# Altium PCB TYPEC_4KTransmitter-v1.0.PcbDoc (part 7 of 12)
Units mil, origin at the board's own origin, x right, y up, seen from the top; angles counter-clockwise.
Board outline 2834.7 x 1259.84 mil, 10 copper layers (Top Layer, GND-1, Signal L1, GND-2, PWR-1, PWR-2, GND-3, Signal L2, GND-4, Bottom Layer), stack 61.686 mil thick; 475 components, 338 nets, 2161 pads, 1240 vias.
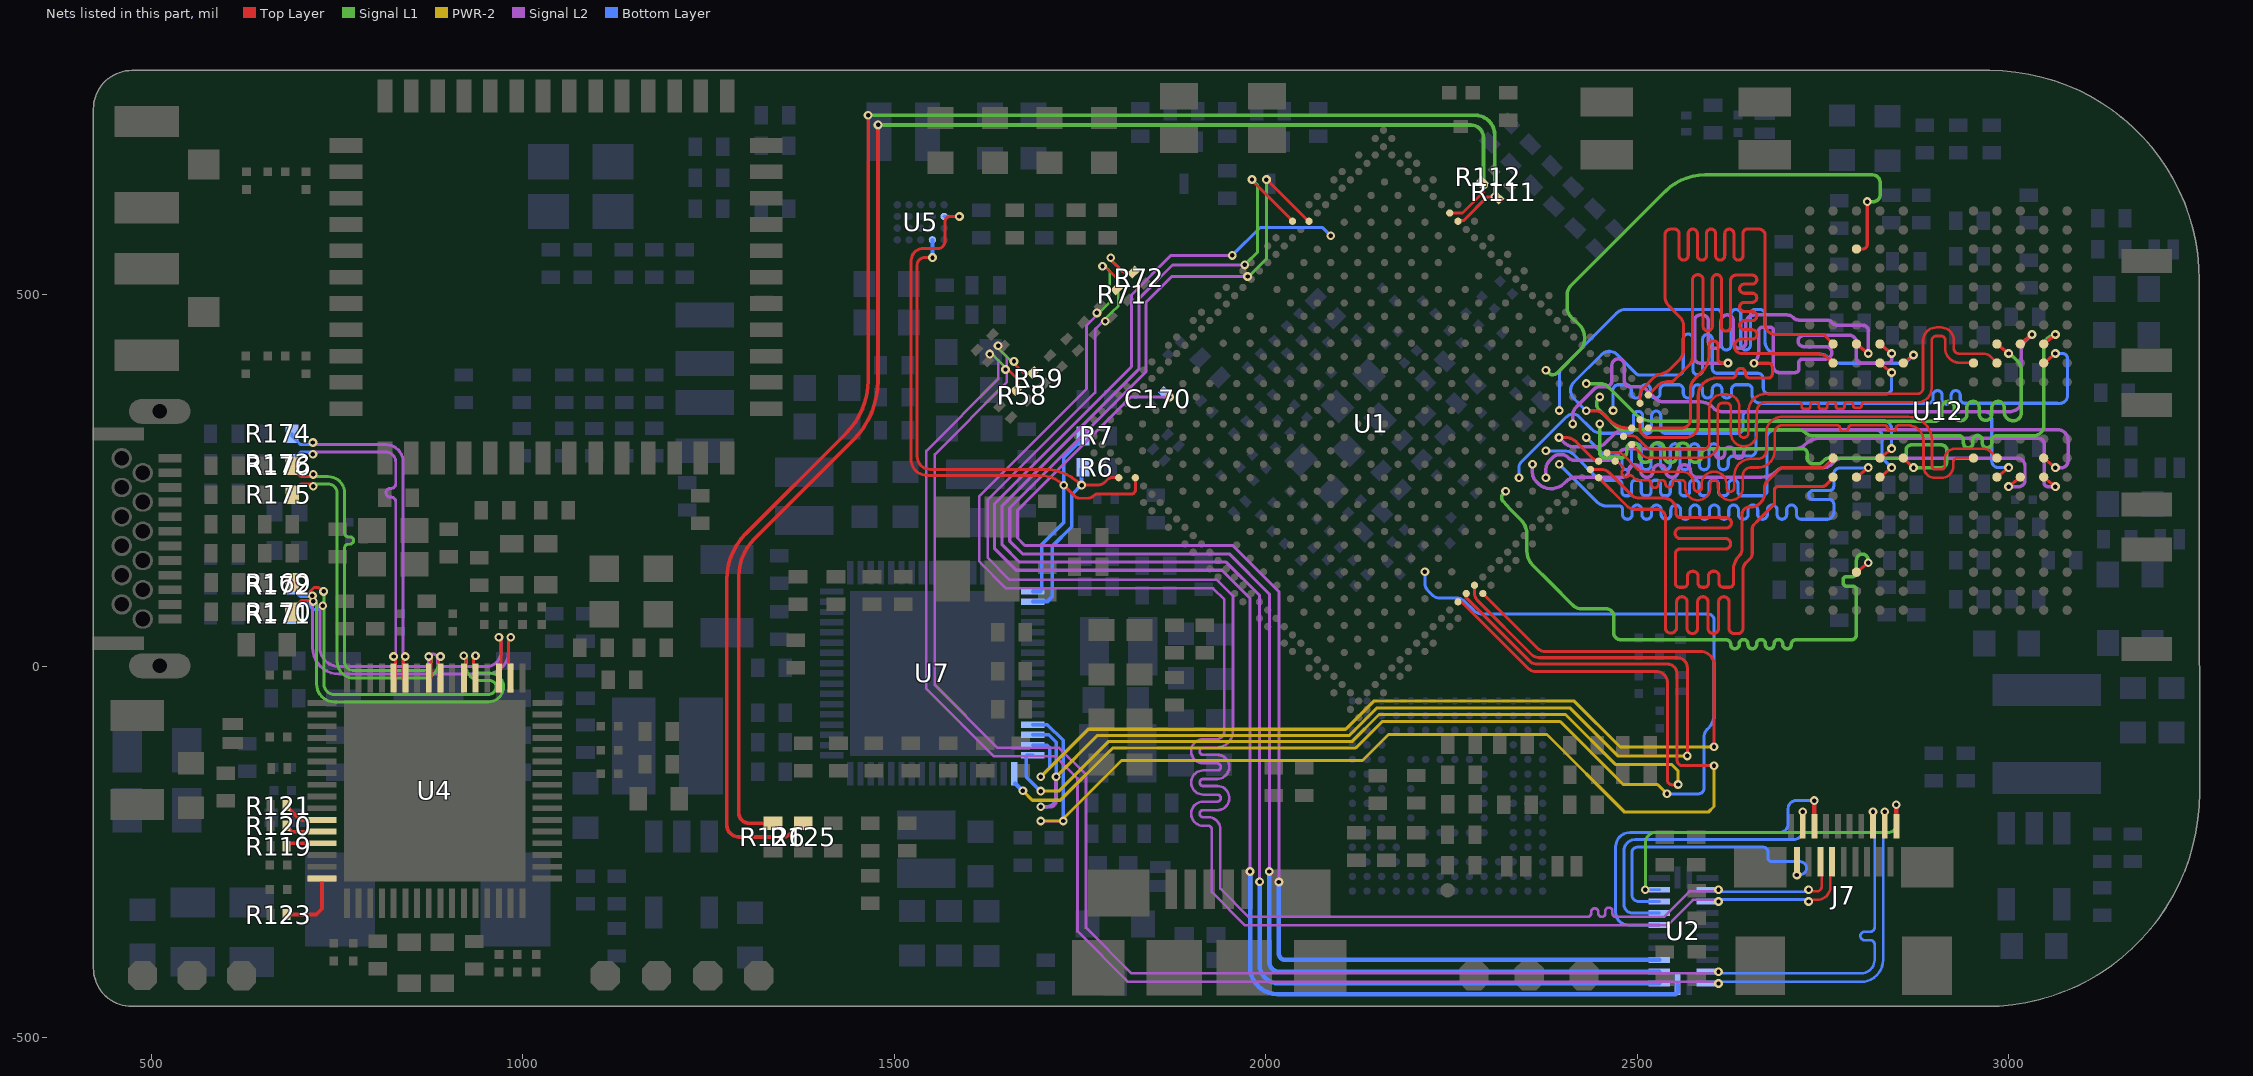
[diagram p13: the nets of this part, all layers, seen from the top]

## Via types
v1: diameter 11.81, hole 5.91, Top Layer to Bottom Layer, tented both sides, 710 vias
v2: diameter 15.75, hole 7.87, Top Layer to Bottom Layer, tented both sides, 265 vias
v3: diameter 11.81, hole 5.91, Top Layer to Signal L1, tented both sides, 146 vias
v4: diameter 11.81, hole 5.91, Signal L2 to Bottom Layer, 60 vias
v5: diameter 11.81, hole 5.91, Signal L1 to Signal L2, 38 vias
v6: diameter 11.81, hole 5.91, Top Layer to Signal L1, 16 vias
v7: diameter 11.81, hole 5.91, Top Layer to Bottom Layer, 4 vias
v8: diameter 11.81, hole 5.91, Signal L1 to Signal L2, tented both sides, 1 vias

## Nets (pads, with @x,y where several pads share a name; then routed paths per layer and width w, separated by ;. In a path a pad name is that pad's centre, name@x,y a point inside that pad or via, vN(x,y) a via of type N, cw(c..) or ccw(c..) an arc to the next point about the centre after c; other vN are vias at no path point) (continued)
HDMI_TX2_N: J7.5 R59.2 U2.21 | length 2361.6
  Top Layer w3.5: v3(1661.42,409.97) 1659.86,408.48 1659.91,408.43 1667.82,400.71 1672.17,396.36 ccw(c1678.29,402.49) 1672.64,395.93 ccw(c1678.29,402.49) 1678.29,393.83 1680.73,393.83 1680.76,393.79 1685.81,393.79 R59.2@1687.2,395.18
  Signal L1 w3.5: v5@1638.43,429.45 1659.63,408.72 cw(c1651.56,400.53) 1659.86,408.48 v3(1661.42,409.97) ; v5@1638.41,429.46 v5(1639.94,430.99)
  Signal L2 w3.5: v5(1639.94,430.99) 1638.41,429.46 1651.6,416.28 1651.6,381.68 1554.84,284.92 1554.84,-25.85 1639.05,-110.07 1722.04,-110.07 1758.33,-146.35 1758.33,-352.16 1819.84,-413.67 2609.6,-413.67 v4(2609.6,-411.52)
  Bottom Layer w3.5: v4(2609.6,-411.52) ccw(c2611.76,-411.52) 2611.76,-413.67 2801.41,-413.67 ccw(c2801.41,-395.44) 2819.64,-395.44 2819.64,-376.57 2819.64,-374.82 ccw(c2813.89,-374.82) 2813.89,-369.07 2806.28,-369.07 cw(c2806.28,-363.32) 2806.28,-357.57 2813.89,-357.57 ccw(c2813.89,-351.82) 2819.64,-351.82 2819.64,-334.6 2819.64,-198.43 ccw(c2817.49,-198.43) v1(2817.49,-196.27)
HDMI_TX2_P: J7.3 R58.2 U2.22 | length 2361.6
  Top Layer w3.5: v3(1650,399.03) 1651.56,400.53 ccw(c1659.86,408.48) 1651.83,400.25 1655.9,396.28 1659.73,392.54 1664.29,387.98 cw(c1661.82,385.5) 1664.53,387.72 cw(c1658.62,382.89) 1666.25,382.89 1666.25,379 1664.7,377.45 R58.2@1664.7,372.41
  Signal L1 w3.5: v5(1628.76,419.81) 1630.28,421.33 ccw(c1634.35,425.4) 1630.33,421.28 1651.51,400.57 1651.56,400.52 v3(1650,399.03)
  Signal L2 w3.5: v5(1628.76,419.81) 1630.28,421.33 1640.1,411.52 1640.1,386.44 1543.34,289.68 1543.34,-30.62 1634.29,-121.57 1717.28,-121.57 1746.83,-151.12 1746.83,-356.92 1815.08,-425.17 2609.6,-425.17 v4(2609.6,-427.33)
  Bottom Layer w3.5: v4(2609.6,-427.33) cw(c2611.76,-427.33) 2611.76,-425.17 2801.41,-425.17 ccw(c2801.41,-395.44) 2831.14,-395.44 2831.14,-198.43 cw(c2833.3,-198.43) v1(2833.3,-196.27)
HDMI_TX_CEC: J7.15 U2.6 | length 503.6
  Top Layer w6: J7.15@2738.58,-215.28 v1(2738.58,-181.19) v1@2738.58,-179.97
  Bottom Layer w4: U2.6@2529.88,-348.4 2487.87,-348.4 cw(c2487.87,-331.76) 2471.23,-331.76 2471.23,-243.21 cw(c2490.25,-243.21) 2490.25,-224.19 2691.44,-224.19 ccw(c2691.44,-212.28) 2703.35,-212.28 2703.35,-191.7 cw(c2713.86,-191.7) 2713.86,-181.19 v1(2738.58,-181.19)
HDMI_TX_HPD: J7.1 U2.9 | length 489.2
  Top Layer w4: v1(2848.79,-186.84) v1@2848.9,-186.95 ; J7.1@2848.9,-215.37 J7.1@2849.02,-215.48
  Top Layer w6: J7.1@2848.9,-215.37 v1@2848.9,-186.95
  Signal L1 w4: v1(2511.11,-301.15) 2511.11,-238.17 cw(c2525.1,-238.17) 2525.1,-224.19 2838.07,-224.19 ccw(c2838.07,-213.3) 2848.96,-213.3 2848.96,-186.84 v1(2848.79,-186.84)
  Bottom Layer w4: v1(2511.11,-301.15) U2.9@2529.88,-301.15
HDMI_TX_SCL: J7.17 U2.7 | length 421.6
  Top Layer w4: J7.17@2723.04,-215.48 v1@2723.04,-198.95
  Bottom Layer w4: U2.7@2529.88,-332.65 2494.06,-332.65 cw(c2494.06,-321.02) 2482.42,-321.02 2482.42,-249.37 2482.41,-249.02 cw(c2497.35,-248.62) 2497.35,-233.68 2710.69,-233.68 ccw(c2710.69,-221.33) 2723.04,-221.33 v1@2723.04,-198.95
  other v1: 2723.04,-196.27
HDMI_TX_SDA: J7.18 U2.8 | length 393.3
  Top Layer w4: v1(2715.08,-281.28) 2715.16,-281.2 J7.18@2715.16,-263.51
  Bottom Layer w4: U2.8@2529.88,-316.9 2502.03,-316.9 cw(c2502.03,-307.93) 2493.06,-307.93 2493.06,-250.93 cw(c2500.12,-250.93) 2500.12,-243.87 2670.09,-243.87 cw(c2670.09,-249.78) 2676,-249.78 2676,-257.6 ccw(c2681.79,-257.6) 2681.79,-263.39 2719.91,-263.39 cw(c2719.91,-267.39) 2720.25,-263.4 cw(c2719.4,-272.08) 2721.35,-280.57 v1(2715.08,-281.28)
HDMI_TXCLK_N: J7.14 R72.2 U2.14 | length 2361.8
  Top Layer w3.5: v3(1791.69,549.37) 1790.17,547.84 1801.95,536.06 1806.48,531.53 ccw(c1813.29,538.35) 1813.29,528.72 1815.69,528.72 1817.16,530.18 R72.2@1822.2,530.18 ; v1(2730.91,-301.09) 2730.91,-303.25 2741.99,-303.25 ccw(c2741.99,-296.71) 2748.53,-296.71 2748.53,-265.39 J7.14@2746.66,-263.51
  Signal L1 w3.5: v5(1784.14,464.1) 1782.61,465.62 1792.57,475.58 1801.72,484.73 1801.72,536.29 1793.85,544.16 cw(c1799.05,549.37) 1792.25,546.56 cw(c1799.05,549.37) v3(1791.69,549.37)
  Signal L2 w3.5: 1770.51,453.52 1770.51,368.02 1625.85,223.36 1625.85,145.75 1655.53,116.07 1934.3,116.07 1956.07,94.3 1956.07,-87.33 cw(c1933.37,-87.33) 1933.37,-110.02 1916.01,-110.02 ccw(c1916.01,-114.77) 1916.01,-119.52 1934.96,-119.52 cw(c1934.96,-135.77) 1934.96,-152.02 1916.01,-152.02 ccw(c1916.01,-156.77) 1916.01,-161.52 1934.96,-161.52 cw(c1934.96,-177.77) 1942.95,-191.93 cw(c1934.96,-177.77) 1934.96,-194.02 1916.01,-194.02 ccw(c1916.01,-198.77) 1916.01,-203.52 1922.99,-203.52 cw(c1922.99,-219.62) 1939.08,-219.62 1939.08,-299.52 1977.23,-337.67 2433.53,-337.67 ccw(c2433.53,-332.92) 2438.28,-332.92 2438.28,-331.04 cw(c2443.03,-331.04) 2447.78,-331.04 2447.78,-332.92 ccw(c2452.53,-332.92) 2457.28,-332.92 2457.28,-329.91 cw(c2462.03,-329.91) 2466.78,-329.91 2466.78,-332.92 ccw(c2471.53,-332.92) 2471.53,-337.67 2536.03,-337.67 2570.46,-303.25 2609.6,-303.25 v4(2609.6,-301.09) ; 1770.89,453.9 1778.93,461.94 cw(c1784.14,456.74) v5(1784.14,464.1)
  Bottom Layer w3.5: v4(2609.6,-301.09) ccw(c2612.21,-301.09) 2612.21,-303.7 2728.3,-303.7 ccw(c2728.3,-301.09) v1(2730.91,-301.09)
HDMI_TXCLK_P: J7.12 R71.2 U2.15 | length 2361.8
  Top Layer w3.5: v3(1780.51,538.19) 1782.04,539.71 1793.82,527.93 1798.99,522.76 cw(c1793.62,517.39) 1801.21,517.39 1801.21,514.24 1799.7,512.72 R71.2@1799.7,507.68 ; v1(2730.91,-316.9) 2730.91,-314.75 2742.62,-314.75 ccw(c2742.62,-297.34) 2760.03,-297.34 2760.03,-265.89 J7.12@2762.41,-263.51
  Signal L1 w3.5: v5(1772.96,475.28) 1774.48,473.76 1784.44,483.71 1790.22,489.49 1790.22,531.53 1788.32,533.43 1785.71,536.04 cw(c1799.05,549.37) 1784.85,536.96 ccw(c1782.19,534.69) 1782.82,538.13 ccw(c1782.19,534.69) v3@1782.19,538.19 ; v3(1780.51,538.19) v3@1782.19,538.19 ; v3@1783.56,538.19 v3@1782.19,538.19
  Signal L2 w3.5: v5(1772.96,475.28) 1774.48,473.76 1762.76,462.03 1759.01,458.29 1759.01,372.78 1614.35,228.12 1614.35,140.99 1650.77,104.57 1929.54,104.57 1944.57,89.54 1944.57,-87.33 cw(c1933.37,-87.33) 1933.37,-98.52 1916.01,-98.52 ccw(c1916.01,-114.77) 1916.01,-131.02 ; 1916.18,-131.02 1934.96,-131.02 cw(c1934.96,-135.77) 1934.96,-140.52 1916.01,-140.52 ccw(c1916.01,-156.77) 1916.01,-173.02 1934.96,-173.02 cw(c1934.96,-177.77) 1934.96,-182.52 1916.01,-182.52 ccw(c1916.01,-198.77) 1916.01,-215.02 1922.45,-215.02 cw(c1922.45,-220.16) 1927.58,-220.16 1927.58,-304.29 1972.46,-349.17 2433.53,-349.17 2540.8,-349.17 2575.22,-314.75 2609.6,-314.75 v4(2609.6,-316.9)
  Bottom Layer w3.5: v4(2609.6,-316.9) cw(c2612.21,-316.9) 2612.21,-314.3 2728.3,-314.3 cw(c2728.3,-316.9) v1(2730.91,-316.9)
HDMITX_CEC: U1.1V5 U2.24 | length 2204.1
  Signal L2 w4.1: v4(1955.2,552.67) 1872.66,552.67 1819.43,499.44 1819.43,402.82 1635.29,218.68 1635.29,157.81 1664.22,128.88 1941.45,128.88 1979.08,91.25 v4(1979.08,-276.57)
  Bottom Layer w4.1: v4(1955.2,552.67) 1992.55,590.03 2076.89,590.03 v1(2087.75,579.16)
  Bottom Layer w6: v4(1979.08,-276.57) 1979.08,-405.02 ccw(c2015.68,-405.02) 2015.68,-441.62 2551.81,-441.62 2554.48,-438.95 U2.24@2554.48,-428.12
HDMITX_HPD: C170.2 U1.1V17 U2.3 | length 1691
  Signal L2 w4.1: v1(1870.52,362.02) 1818.34,362.02 1665.97,209.65 1665.97,172.24 1675.91,162.29 1955.82,162.29 2017.92,100.19 v4(2017.92,-290.66)
  Bottom Layer w6: v4(2017.92,-290.66) 2017.92,-387.07 ccw(c2026.5,-387.07) 2026.5,-395.66 U2.3@2529.88,-395.64
HDMITX_SCL: U1.AR12 U2.1 | length 2194.9
  Top Layer w4.1: v3(1981.78,654.81) 1981.78,653.96 2036.26,599.49 U1.AR12@2036.26,598.64
  Signal L1 w4.1: v5@1973.36,541.22 1989.33,557.19 1989.33,647.27 v3(1981.78,654.81)
  Signal L2 w4.1: v5(1971.84,539.83) 1874.71,539.83 1829.32,494.44 1829.32,399.61 1645.42,215.71 1645.42,163.12 1668.73,139.81 1947.02,139.81 1991.99,94.84 v4(1991.99,-290.44)
  Bottom Layer w6: v4(1991.99,-290.44) 1991.99,-402.12 ccw(c2017.1,-402.12) 2017.1,-427.23 2529.78,-427.23 U2.1@2529.88,-427.14
HDMITX_SDA: U1.AP11 U2.2 | length 2175.4
  Top Layer w4.1: v3(2001.1,654.65) 2001.81,654.65 2057.81,598.64 U1.AP11@2058.53,598.64
  Signal L1 w4.1: v5(1975.74,524.26) 1977.46,524.26 2001.21,548.02 2001.21,654.53 v3(2001.1,654.65)
  Signal L2 w4.1: v5(1975.74,524.26) 1873.71,524.26 1838.8,489.35 1838.8,395.82 1655.65,212.68 1655.65,168.08 1672.78,150.95 1951.08,150.95 2005.01,97.02 v4@2005.01,-274.32
  Bottom Layer w6: v4(2005.01,-276.57) 2005.01,-398.33 ccw(c2018.13,-398.33) 2018.13,-411.45 2529.81,-411.45 U2.2@2529.88,-411.39
I2C0_SCL_PMIC: R7.2 U1.AJ37 U5.A3 U7.1 | length 985.4
  Top Layer w4: 1523.05,275.03 ccw(c1527.05,275.08) 1523.09,274.48 ccw(c1544.08,277.95) 1544.08,256.68 ; 1523.05,275.08 1523.05,545.73 cw(c1539.23,545.73) 1539.23,561.91 1559.4,561.91 ; 1544.12,256.68 1628.56,256.68 1682.49,256.68 1695.2,256.68 cw(c1695.2,208.78) 1729.08,242.65 1743.19,228.53 ccw(c1749.73,235.01) 1749.73,225.8 ; 1559.42,561.91 ccw(c1559.4,565.91) 1559.86,561.93 ccw(c1558.7,571.52) 1568.35,571.86 1568.33,572.27 1568.33,597.56 cw(c1575.84,597.56) 1575.84,605.06 v1(1587.86,605.06) ; 1749.76,225.8 1760.51,225.8 ccw(c1760.51,237.11) 1765.25,226.85 ccw(c1760.51,237.11) 1768.5,229.12 cw(c1774.64,222.98) 1774.64,231.66 1785.38,231.66 1799.42,231.66 1819.75,231.66 ccw(c1819.74,236.6) 1824.68,236.6 U1.AJ37@1824.68,253.44
  Bottom Layer w4.1: U5.A3@1567.36,605.06 v1(1587.86,605.06)
  Bottom Layer w5: U7.1@1686.51,100.27 1696.86,100.27 1698.69,102.1 1698.69,163.45 1728.41,193.17 1728.41,280.69 1736.85,289.13 1747.3,299.58 1747.68,299.58 1754.18,306.08 R7.2@1754.18,307.58
  other v1: 1728.41,243.4
I2C0_SDA_PMIC: R6.2 U1.AK38 U5.B1 U7.2 | length 818.1
  Top Layer w4: v1(1551.61,549.73) 1540.93,549.73 ccw(c1540.93,539.85) 1531.05,539.85 1531.05,281.91 ccw(c1548.2,281.91) 1548.2,264.76 1701,264.76 1701.05,264.76 cw(c1701.03,192.23) v1(1752.31,243.49)
  Top Layer w4.1: v1(1752.31,243.49) 1773,243.49 ccw(c1773,259.69) 1784.46,248.23 1787.96,251.73 cw(c1792.1,247.59) 1792.1,253.44 U1.AK38@1802.41,253.44
  Bottom Layer w4: R6.2@1752.54,265.61 R6.2@1754.18,267.26
  Bottom Layer w5: v1(1551.61,549.73) U5.B1@1551.61,573.56 ; U7.2@1686.51,86.49 1686.97,86.95 1706.54,86.95 1712.7,93.1 1712.7,160.99 1739.11,187.4 1739.11,230.56 v1@1752.04,243.49 ; v1(1752.31,243.49) 1752.36,265.43 R6.2@1752.54,265.61
I2C4_SCL_M1: R111.2 R125.1 U1.AE2 | length 2150.4
  Top Layer w4.1: U1.AE2@2258.97,598.64 2260.07,599.74 2266.73,599.74 2298.45,631.46 2311.24,631.46 R111.2@2312.63,630.07
  Top Layer w5: R125.1@1375.54,-214.23 1371.46,-214.23 1358.9,-226.79 cw(c1351.15,-219.07) 1351.15,-230.01 1291.08,-230.01 cw(c1291.08,-213.69) 1274.75,-213.69 1274.75,115.83 cw(c1363.23,115.86) 1300.7,178.45 1435.44,313.2 ccw(c1364.18,384.53) 1465.01,384.53 v3(1465.01,741.19)
  Signal L1 w5: v3@1465.85,741.19 2282,741.19 cw(c2282,714.75) 2308.45,714.75 v3(2308.45,631.57)
I2C4_SDA_M1: R112.2 R126.1 U1.AF2 | length 2004.9
  Top Layer w4.1: U1.AF2@2247.83,609.78 2265.04,609.78 2293.29,638.03 2293.29,647.15 R112.2@2292.94,647.5
  Top Layer w5: 1291.08,120.8 1291.08,-198.01 ccw(c1304.58,-198.01) 1304.58,-211.51 R126.1@1336.98,-211.51 ; 1291.08,120.83 cw(c1362.47,120.78) 1312,171.28 1445.27,304.55 ccw(c1365.71,384.15) 1478.25,384.15 v3@1478.25,728.28
  Signal L1 w5: v3@1478.58,728.15 2276.28,728.15 cw(c2276.28,711.04) 2293.39,711.04 v3(2293.39,646.98)
  other v3: 1478.43,728.28
I2S1_LRCK_TX_M0: U1.B24 U7.14 | length 1744.7
  Top Layer w4.1: U1.B24@2270.1,97.55 2270.1,91.75 2354.94,6.91 ccw(c2365.54,17.53) 2365.54,2.53 2540.77,2.53 cw(c2540.77,-10.5) 2553.8,-10.5 2553.8,-126.55 ccw(c2561.41,-126.55) 2561.41,-134.17 v1(2603.61,-134.17)
  PWR-2 w4.1: v5(1697.36,-208.57) 1724.65,-208.57 1806,-127.22 2130.49,-127.22 2165.51,-92.21 2378.72,-92.21 2483.28,-196.77 2595.9,-196.77 2603.61,-189.05 v1(2603.61,-134.17)
  Signal L2 w4.5: v5(1697.36,-208.57) v4(1727.53,-208.57)
  Bottom Layer w4.5: U7.14@1686.51,-78.87 1686.62,-78.98 1706.37,-78.98 1727.53,-100.14 v4@1727.53,-205.57
I2S1_MCLK_M0: U1.A23 U7.16 | length 1505.6
  Top Layer w4.1: U1.A23@2292.37,97.55 2365.77,24.12 ccw(c2376.88,35.15) 2376.84,19.49 2585.41,19.49 cw(c2585.41,1.29) 2603.61,1.29 v1(2603.61,-108.75)
  PWR-2 w4.1: v1(1697.36,-148.97) 1761.22,-85.11 2107.82,-85.11 2145.54,-47.38 2415.54,-47.38 2476.91,-108.75 v1(2603.61,-108.75)
  Bottom Layer w4.5: U7.16@1686.67,-106.59 1706.41,-106.59 1709.56,-109.74 1709.56,-136.77 v1(1697.36,-148.97)
I2S1_SCLK_TX_M0: U1.B23 U7.15 | length 1571.1
  Top Layer w4.1: U1.B23@2281.24,108.68 2281.24,98.44 ccw(c2296.24,98.44) 2285.63,87.84 2357.93,15.53 ccw(c2368.54,26.14) 2368.54,11.14 2554.36,11.14 cw(c2554.36,-2.11) 2567.61,-2.11 v1(2567.61,-120.97)
  PWR-2 w4.1: v5(1718.05,-148.97) 1773.36,-93.67 2112.78,-93.67 2150.09,-56.36 2409.49,-56.36 2474.11,-120.97 v1(2567.61,-120.97)
  Signal L2 w5: v4(1697.36,-189.47) 1709.25,-189.47 ccw(c1709.25,-180.68) 1718.05,-180.68 v5(1718.05,-148.97)
  Bottom Layer w4.5: U7.15@1686.51,-92.65 1708.01,-92.65 1718.15,-102.79 1718.15,-175.75 cw(c1704.37,-175.75) 1714.11,-185.5 cw(c1704.37,-175.75) 1704.37,-189.53 v4@1697.36,-189.53
I2S1_SDI0_M0: U1.1B14 U7.18 | length 1680.8
  PWR-2 w4.1: v1(1673.36,-167.97) 1686.06,-180.68 1723.65,-180.68 1794.09,-110.23 2121.19,-110.23 2156.84,-74.58 2396.43,-74.58 2481.24,-159.39 2527.67,-159.39 v1(2540.26,-171.97)
  Bottom Layer w4.1: v1@2214.42,126.78 2214.42,111.67 ccw(c2229.42,111.67) 2218.81,101.07 2223.96,95.92 ccw(c2234.57,106.53) 2234.57,91.53 2257.14,91.53 cw(c2257.14,76.53) 2267.74,87.14 2279.98,74.9 ccw(c2291.88,86.79) 2291.88,69.97 2595.55,69.97 cw(c2595.55,61.9) 2603.61,61.9 2603.61,-65.65 cw(c2578.43,-65.65) 2596.22,-83.47 2594.7,-84.99 ; v1(2540.26,-171.97) 2583.06,-171.97 ccw(c2583.06,-165.16) 2589.87,-165.16 2589.87,-96.67 cw(c2606.38,-96.67) 2594.69,-85.01
  Bottom Layer w6: U7.18@1663.34,-158.61 v1@1672.36,-167.62
  other v1: 2214.42,126.78
I2S1_SDO0_M0: U1.B25 U7.17 | length 1492.8
  Top Layer w4.1: U1.B25@2258.97,86.41 2263.8,86.41 2353.29,-3.09 ccw(c2363.89,7.53) 2363.89,-7.47 2525.98,-7.47 cw(c2525.98,-22.29) 2540.8,-22.29 2540.8,-153.28 ccw(c2547.39,-153.32) 2547.25,-159.91 ccw(c2547.3,-155.81) 2547.31,-159.91 2547.42,-159.91 2547.53,-159.91 v1(2555.26,-159.47)
  PWR-2 w4.1: v1(1697.36,-168.42) 1721.66,-168.42 1788.18,-101.9 2116,-101.9 2152.55,-65.35 2403.76,-65.35 2470.68,-132.27 2546.24,-132.27 2555.26,-141.29 v1(2555.26,-159.47)
  Bottom Layer w5: U7.17@1686.51,-120.21 1678.63,-120.21 1677.8,-121.04 1677.8,-149.24 1696.98,-168.42 v1(1697.36,-168.42)
I2S3_LRCK_M1: R121.2 U4.27 | length 53.8
  Top Layer w5: R121.2@683.33,-189.84 685.07,-191.58 700.64,-207.15 U4.27@729.93,-207.15
I2S3_MCLK_M1: R119.2 U4.29 | length 43.9
  Top Layer w5: R119.2@686.07,-238.65 U4.29@729.93,-238.65
I2S3_SCLK_M1: R120.2 U4.28 | length 45.9
  Top Layer w5: R120.2@685.54,-219.25 689.19,-222.9 U4.28@729.93,-222.9
I2S3_SDO_M1: R123.2 U4.32 | length 91.8
  Top Layer w5: R123.2@682.25,-334.58 722.13,-334.58 729.93,-326.78 U4.32@729.93,-285.89
LANE0_RX1_N: R171.1 U4.3 | length 475.1
  Top Layer w4.1: v7(968.08,38.65) 970.94,38.65 U4.3@970.94,-4.92
  Signal L2 w4: v4(731.07,81.18) ccw(c731.07,77.27) 727.16,77.27 727.16,25.06 ccw(c753.09,25.06) 753.09,-0.86 857.97,-0.86 867.37,-0.86 ccw(c867.37,5.14) 873.37,5.14 873.37,10.21 cw(c879.37,10.21) 885.37,10.21 885.37,5.14 ccw(c891.37,5.14) 891.37,-0.86 905.37,-0.86 950.71,-0.86 ccw(c950.71,19.41) 970.99,19.41 970.99,35.75 ccw(c968.08,35.75) v7(968.08,38.65)
  Bottom Layer w4.1: R171.1@689.36,69.15 689.36,72.65 700.74,84.04 710.23,84.04 718.28,75.98 724.56,75.98 729.76,81.18 v4(731.07,81.18)
LANE0_RX1_P: R172.1 U4.2 | length 475
  Top Layer w4.1: U4.2@981.04,-4.92 981.04,38.65 v7(983.89,38.65)
  Signal L2 w4: v4(717.06,94.62) 717.16,94.62 717.16,25.06 ccw(c753.09,25.06) 753.09,-10.86 950.71,-10.86 ccw(c950.71,19.41) 980.99,19.41 980.99,35.75 cw(c983.89,35.75) v7(983.89,38.65)
  Bottom Layer w4.1: R172.1@689.36,108.45 689.36,104.95 700.74,93.57 716.01,93.57 v4(717.06,94.62)
LANE1_TX1_N: R169.1 U4.6 | length 512.3
  Top Layer w4.1: R169.1@690.36,112.39 690.36,108.89 701.74,97.5 711.23,97.5 719.28,105.55 725.56,105.55 730.76,100.36 v6(732.07,100.36) ; v3(920.84,13.73) 923.7,13.73 923.7,3.48
  Signal L1 w4: v6(732.07,100.36) 732.07,96.91 732.73,96.91 732.73,-24.57 ccw(c746.38,-24.57) 746.38,-38.21 954.06,-38.21 ccw(c954.06,-28.02) 964.25,-28.02 ccw(c955.87,-28.02) 955.87,-19.64 943.65,-19.64 cw(c943.65,-5.64) 943.1,-19.63 942.64,-19.61 cw(c943.18,-5.62) 942.02,-19.57 cw(c943.65,0.26) 923.75,0.26 923.75,13.73 v3(920.84,13.73)
LANE1_TX1_P: R170.1 U4.5 | length 511.9
  Top Layer w4.1: R170.1@690.35,73.08 690.35,76.58 701.74,87.97 717.01,87.97 v6(718.06,86.91) ; 933.8,3.48 933.8,13.73 v3(936.65,13.73)
  Signal L1 w4: v6(718.06,86.91) cw(c718.06,82.24) 722.73,82.24 722.73,-24.57 ccw(c746.38,-24.57) 746.38,-48.21 954.06,-48.21 ccw(c954.06,-28.02) 974.25,-28.02 ccw(c955.87,-28.02) 955.87,-9.64 943.65,-9.64 cw(c943.65,-5.64) 943.49,-9.64 943.03,-9.62 cw(c943.18,-5.62) 942.87,-9.61 ; v3(936.65,13.73) ccw(c936.65,10.82) 933.75,10.82 933.75,0.26 ccw(c943.65,0.26) 942.84,-9.61
LANE2_RX2_N: R176.1 U4.9 | length 512
  Top Layer w4.1: R176.1@690.09,269.6 690.09,266.1 697.04,259.15 697.28,259.15 701.43,255 718.1,255 v3(718.1,257.85) ; v3(873.59,12.76) 876.45,12.76 876.45,-16.21 U4.9@873.63,-16.21
  Signal L1 w4: v3(718.1,257.85) ccw(c721,257.85) 721,254.95 738.33,254.95 cw(c738.33,232.91) 760.36,232.91 760.36,180.89 760.36,178.89 ccw(c765.36,178.89) 765.36,173.89 767.48,173.89 cw(c767.48,168.89) 767.48,163.89 765.36,163.89 ccw(c765.36,158.89) 760.36,158.89 760.36,144.23 760.36,6.19 ccw(c772.89,6.19) 772.89,-6.33 865.97,-6.33 ccw(c865.97,4.19) 876.5,4.19 876.5,4.93 876.5,9.86 ccw(c873.59,9.86) v3(873.59,12.76)
LANE2_RX2_P: R175.1 U4.8 | length 512.1
  Top Layer w4.1: R175.1@690.09,230.3 690.09,233.8 697.04,240.75 697.42,240.75 701.57,244.9 718.1,244.9 v3(718.1,242.04) ; U4.8@889.37,-16.21 886.55,-16.21 886.55,12.76 v3(889.41,12.76)
  Signal L1 w4: v3(718.1,242.04) cw(c721,242.04) 721,244.95 738.33,244.95 cw(c738.33,232.91) 750.36,232.91 750.36,6.19 ccw(c772.89,6.19) 772.89,-16.33 865.97,-16.33 ccw(c865.97,4.19) 886.5,4.19 886.5,4.89 886.5,9.86 cw(c889.41,9.86) v3(889.41,12.76)
LANE3_TX2_N: R173.1 U4.12 | length 475.1
  Top Layer w4.1: v1(826.35,12.76) 829.21,12.76 829.21,-16.21 U4.12@826.38,-16.21
  Signal L2 w4: v4(717.68,285.04) cw(c720.58,285.04) 720.58,287.95 815.92,287.95 cw(c815.92,274.61) 829.26,274.61 829.26,259.18 829.26,245.18 cw(c823.26,245.18) 823.26,239.18 822.03,239.18 ccw(c822.03,233.18) 822.03,227.18 823.26,227.18 cw(c823.26,221.18) 829.26,221.18 829.26,204.49 829.26,12.76 v1(826.35,12.76)
  Bottom Layer w4.1: R173.1@689.68,273.3 689.68,276.56 696.63,283.51 696.88,283.51 701.15,287.78 717.68,287.78 v4(717.68,285.04)
LANE3_TX2_P: R174.1 U4.11 | length 475.1
  Top Layer w4.1: U4.11@842.13,-16.21 839.31,-16.21 839.31,12.76 v1(842.16,12.76)
  Signal L2 w4: v4(717.68,300.85) ccw(c720.58,300.85) 720.58,297.95 815.92,297.95 cw(c815.92,274.61) 839.26,274.61 839.26,52.27 839.26,40.59 839.26,12.76 v1(842.16,12.76)
  Bottom Layer w4.1: R174.1@689.68,312.6 689.68,309.1 696.63,302.15 697.05,302.15 701.32,297.88 717.68,297.88 v4(717.68,300.85)
LPDDR4_A0_A: U1.C2 U12.H2 | length 924.2
  Top Layer w4.2: U1.C2@2503.95,353.66 2503.95,363.68 cw(c2518,363.68) 2508.06,373.61 ; 2508.06,373.62 2524.02,389.57 cw(c2532.41,381.17) 2528.87,392.5 ccw(c2526.87,417.49) 2544.59,399.77 2557.1,412.28 ccw(c2543.64,425.77) 2562.7,425.77 2562.7,457.61 ccw(c2545.79,457.61) 2557.75,469.57 2543.32,484 cw(c2557.72,498.4) 2537.36,498.4 2537.36,579.96 cw(c2545.5,579.96) 2545.5,588.1 2550.12,588.1 cw(c2550.12,581.7) 2556.51,581.7 2556.51,552.39 ccw(c2562.66,552.39) 2568.81,552.39 2568.81,581.95 cw(c2574.96,581.95) 2581.11,581.95 2581.11,552.39 ccw(c2587.26,552.39) 2593.41,552.39 2593.41,581.95 cw(c2599.56,581.95) 2605.71,581.95 2605.71,552.39 ccw(c2611.86,552.39) 2618.01,552.39 2618.01,581.95 cw(c2624.16,581.95) 2630.31,581.95 2630.31,552.39 ccw(c2636.46,552.39) 2642.61,552.39 2642.61,582.19 cw(c2648.52,582.19) 2648.52,588.1 2663.74,588.1 cw(c2663.74,579.48) 2672.36,579.48 2672.36,460.11 ccw(c2686.37,460.11) 2686.37,446.1 2751.14,446.1 U12.H2@2763.85,433.4
LPDDR4_A0_B: U1.A9 U12.R2 | length 924.9
  Top Layer w4.2: U1.A9@2448.27,253.44 2486.35,215.36 ccw(c2496.96,225.97) 2496.96,210.97 2527.37,210.97 cw(c2527.37,200.16) 2538.18,200.16 2538.18,51.19 ccw(c2545.18,51.19) 2545.18,44.19 ccw(c2545.18,52.25) 2553.25,52.25 2553.25,86.24 cw(c2560.3,86.24) 2567.35,86.24 2567.35,50.67 ccw(c2574.4,50.67) 2581.45,50.67 2581.45,86.24 cw(c2588.5,86.24) 2595.55,86.24 2595.55,50.67 ccw(c2602.6,50.67) 2609.65,50.67 2609.65,86.24 cw(c2616.7,86.24) 2623.75,86.24 2623.75,50.65 ccw(c2630.77,50.65) 2630.77,43.62 2635.84,43.62 ccw(c2635.84,50.2) 2642.42,50.2 2642.42,128.93 ; 2642.42,128.96 cw(c2656.8,128.99) 2646.61,139.14 2652.8,145.33 ccw(c2647.5,150.61) 2654.98,150.61 2654.98,184.65 cw(c2663.26,184.62) 2657.41,190.47 2662.37,195.44 2683.43,216.5 ccw(c2679.98,219.93) 2684.85,219.93 2684.85,236.61 cw(c2689.75,236.61) 2689.75,241.51 2748.84,241.51 ccw(c2748.85,249.58) 2754.57,243.89 U12.R2@2764.88,254.2
LPDDR4_A1_A: U1.C1 U12.J2 | length 923.8
  Top Layer w4.2: U1.C1@2515.08,364.8 2527.58,377.29 cw(c2540.21,364.66) 2540.21,382.53 2545.13,382.53 ccw(c2545.13,388.2) 2549.14,384.19 2570.78,405.83 ccw(c2562.05,414.56) 2574.39,414.56 2574.39,519.19 cw(c2581.93,519.19) 2581.93,526.72 cw(c2581.93,519.75) 2588.91,519.75 2588.91,457.22 ccw(c2595.06,457.22) 2601.21,457.22 2601.21,520.57 cw(c2607.36,520.57) 2613.51,520.57 2613.51,456.87 ccw(c2619.66,456.87) 2625.81,456.87 2625.81,518.83 cw(c2633.05,518.83) 2633.05,526.07 2655.25,526.07 cw(c2655.25,520.19) 2661.13,520.19 cw(c2654.98,520.19) 2654.98,514.04 2644.19,514.04 ccw(c2644.19,507.89) 2644.19,501.74 2654.98,501.74 cw(c2654.98,495.59) 2654.98,489.44 2644.19,489.44 ccw(c2644.19,483.29) 2644.19,477.14 2654.98,477.14 cw(c2654.98,470.99) 2654.98,464.84 2644.19,464.84 ccw(c2644.19,458.69) 2644.19,452.54 2654.98,452.54 ; 2655.3,452.5 cw(c2655.3,446.35) 2655.3,440.2 2640.99,440.2 ccw(c2640.99,430.36) 2640.99,420.51 2741.53,420.51 ; 2741.58,420.51 cw(c2741.56,397.37) 2757.89,413.76 U12.J2@2763.85,407.81
LPDDR4_A1_B: U1.B9 U12.P2 | length 924.2
  Top Layer w4.2: U1.B9@2437.14,264.58 2451.77,264.58 cw(c2451.77,249.58) 2462.38,260.19 2492.25,230.31 ccw(c2502.86,240.92) 2502.86,225.92 2536.73,225.92 cw(c2536.73,210.92) 2547.33,221.53 2548.02,220.84 cw(c2537.42,210.23) 2552.42,210.23 2552.42,205.58 ccw(c2558.18,205.58) 2558.18,199.82 2619.9,199.82 cw(c2619.9,192.77) 2619.9,185.72 2558.18,185.72 ccw(c2558.18,178.67) 2558.18,171.62 2618.92,171.62 cw(c2618.92,164.57) 2618.92,157.52 2558.18,157.52 ccw(c2558.18,150.83) 2551.5,150.83 2551.5,111.46 ccw(c2556.88,111.46) 2556.88,106.08 2562.72,106.08 ccw(c2562.72,111.33) 2567.97,111.33 2567.97,121 cw(c2574.42,121) 2574.42,127.46 2575.63,127.46 cw(c2575.63,121.02) 2582.07,121.02 2582.07,111.33 ccw(c2587.31,111.33) 2587.31,106.08 2590.92,106.08 ccw(c2590.92,111.33) 2596.17,111.33 2596.17,121 cw(c2602.77,121) 2602.77,127.61 2603.68,127.61 cw(c2603.68,121.02) 2610.27,121.02 2610.27,111.33 ccw(c2615.51,111.33) 2615.51,106.08 2624.63,106.08 ccw(c2624.63,111.16) 2629.71,111.16 2629.71,121.28 2629.71,130.04 cw(c2654.34,130.03) 2636.95,147.47 2637,147.52 ccw(c2626.39,158.12) 2641.39,158.12 2641.39,204.7 cw(c2650.61,204.7) 2650.61,213.92 2652.74,213.92 ccw(c2652.74,232.69) 2671.51,232.69 2671.51,240.09 cw(c2682.95,240.09) 2674.84,248.16 2691.15,264.47 cw(c2697.47,258.15) 2697.47,267.09 2748.37,267.09 ccw(c2748.37,273.67) 2753.02,269.02 U12.P2@2763.85,279.85
LPDDR4_A2_A: U1.1C1 U12.H9 | length 828.6
  Top Layer w4.2: U12.H9@2984.32,433.4 v1(3000.07,420.6)
  Signal L1 w4.7: v1(2431.56,380.11) 2450.57,380.11 ; 2450.62,380.11 cw(c2450.66,365.57) 2460.94,375.86 2465.71,371.08 2497.99,338.81 ; 2498.01,338.79 ccw(c2520.27,361.09) 2520.27,329.58 2900.97,329.58 ccw(c2900.97,338.88) 2910.27,338.88 2910.27,347.68 cw(c2918.67,347.68) 2927.07,347.68 2927.07,338.66 ccw(c2935.47,338.66) 2943.87,338.66 2943.87,347.68 cw(c2952.27,347.68) 2960.67,347.68 2960.67,338.91 ccw(c2969.07,338.91) 2977.47,338.91 2977.47,347.68 cw(c2985.87,347.68) 2994.27,347.68 2994.27,341.89 ; 2994.27,341.81 ccw(c3006.26,341.89) 3006.34,329.9 ccw(c3006.26,341) 3017.36,341 3017.36,398.11 ccw(c3000.67,398.11) 3012.47,409.92 ; v1(3000.07,420.6) 3001.79,420.6 3012.43,409.95
LPDDR4_A2_B: U1.1B7 U12.R9 | length 934.9
  Top Layer w4.2: U12.R9@2984.32,254.26 v1(3000.07,267.05)
  Bottom Layer w4.2: v1(2341.09,253.44) 2341.09,267.55 cw(c2350.48,267.55) 2343.19,273.46 2405.5,335.77 cw(c2413.62,327.68) 2420.39,336.93 cw(c2417.93,333.65) 2420.81,336.58 2438.21,319.17 ccw(c2452.54,333.5) 2452.54,313.23 2489.16,313.23 ccw(c2489.16,319.33) 2495.26,319.33 2495.26,336.71 cw(c2501.36,336.71) 2507.46,336.71 2507.46,318.76 ccw(c2513.56,318.76) 2519.66,318.76 2519.66,336.98 cw(c2525.76,336.98) 2531.86,336.98 2531.86,319.33 ccw(c2537.96,319.33) 2537.96,313.23 2635.56,313.23 ccw(c2635.56,320.25) 2642.58,320.25 2642.58,335.9 ; v1(3000.07,267.05) 2986.45,267.05 cw(c2986.45,276.15) 2977.36,276.15 2977.36,333.31 ccw(c2968.14,333.31) 2968.14,342.53 2879.24,342.53 2648.91,342.53 ; 2642.58,335.9 cw(c2650.8,335.93) 2644.3,340.96 cw(c2647.53,338.43) 2647.53,342.53 2648.91,342.53 ; 2642.58,335.9 2642.58,337.72 cw(c2646.68,337.69) 2644.21,340.96 cw(c2648.91,334.69) 2648.91,342.53
LPDDR4_A3_A: U1.1B3 U12.H10 | length 828.6
  Top Layer w4.2: U12.H10@3015.82,433.4 v1(3031.57,446.19)
  Signal L2 w4.7: v1(2413.47,325.83) 2413.47,337.43 cw(c2429.19,337.43) 2418.06,348.53 2442.68,373.15 cw(c2449.01,366.79) 2449.01,375.77 2457.74,375.77 ccw(c2457.74,384.17) 2466.14,384.17 2466.14,404.92 cw(c2474.54,404.92) 2482.94,404.92 2482.94,384.17 ccw(c2491.34,384.17) 2491.34,375.77 2502.67,375.77 cw(c2502.67,360.77) 2513.27,371.38 2524.38,360.27 ccw(c2535.84,371.73) 2535.84,355.53 2585.69,355.53 cw(c2585.69,334.6) 2600.47,349.41 ; 2600.49,349.4 2602.97,346.91 ccw(c2613.57,357.53) 2613.57,342.53 3002.65,342.53 ccw(c3002.65,357.24) 3017.36,357.24 3017.36,425.76 cw(c3032.36,425.76) 3021.75,436.37 v1(3031.57,446.19)
LPDDR4_A3_B: U1.1B6 U12.R10 | length 828.5
  Top Layer w4.2: v1(3000.07,241.46) U12.R10@3015.82,254.26
  Signal L2 w4.7: v1(2359.18,271.54) 2359.15,260.42 ccw(c2375.5,260.42) 2363.73,249.08 2364.62,247.97 ccw(c2384.21,263.85) 2402.04,246.02 2404.46,248.44 cw(c2418.15,234.75) 2418.15,254.11 2479.7,254.11 ccw(c2479.7,262.81) 2488.4,262.77 ; 2488.4,262.81 cw(c2496.65,262.78) 2504.9,262.81 ; 2504.9,262.77 2504.9,262.51 ccw(c2513.3,262.51) 2521.7,262.51 2521.7,262.81 cw(c2530.1,262.81) 2538.5,262.81 2538.5,262.51 ccw(c2546.9,262.51) 2555.3,262.51 2555.3,262.78 ; 2555.3,262.81 cw(c2563.55,262.78) 2571.79,262.8 ccw(c2580.5,262.81) 2580.5,254.11 2667.38,254.11 ccw(c2667.38,283.22) 2687.95,262.62 ; 2687.97,262.64 cw(c2698.57,252.03) 2698.57,267.03 2751.14,267.03 ccw(c2751.14,282.03) 2761.74,271.41 2766.15,275.82 cw(c2776.07,265.89) 2766.32,275.99 cw(c2776.07,265.89) 2776.07,279.93 3011.09,279.93 cw(c3011.09,268.88) 3022.14,268.88 3022.14,249.88 cw(c3013.72,249.88) 3013.72,241.46 v1(3000.07,241.46)
LPDDR4_A4_A: U1.1B1 U12.H11 | length 834.1
  Top Layer w4.2: U12.H11@3047.31,433.4 v1(3063.06,446.19)
  Signal L1 w4.7: v1(2449.66,362.02) 2448.51,360.81 ccw(c2456.74,352.99) 2448.74,344.93 2471.55,322.12 ; 2471.58,322.09 ccw(c2480.88,331.4) 2480.88,318.24 ; 2480.93,318.24 2716.89,318.24 cw(c2716.89,305.07) 2726.17,314.42 ccw(c2736.78,325.04) 2726.23,314.37 ccw(c2736.78,325.04) 2736.78,310.03 2932.94,310.03 cw(c2932.94,303.68) 2939.29,303.68 2939.29,299.94 ccw(c2945.64,299.94) 2951.99,299.94 2951.99,303.98 cw(c2958.34,303.98) 2964.69,303.98 2964.69,299.94 ccw(c2971.04,299.94) 2977.39,299.94 2977.39,303.68 cw(c2983.74,303.68) 2983.74,310.03 3033.98,310.03 ccw(c3033.98,323.31) 3047.26,323.31 3047.26,429.13 ; 3047.26,429.16 cw(c3063.84,429.16) 3059.27,445.1 v1(3063.06,446.19)
LPDDR4_A4_B: U1.1A6 U12.R11 | length 834
  Top Layer w4.2: U12.R11@3047.31,254.26 v1(3063.06,241.46)
  Signal L2 w4.7: v1(2377.28,253.44) 2377.28,265.44 cw(c2391.26,265.44) 2381.36,275.31 2387.98,281.93 cw(c2393.46,276.45) 2393.46,284.2 2400.26,284.2 cw(c2400.26,276.12) 2405.98,281.84 2407.91,279.91 ccw(c2414.99,286.99) 2414.99,276.97 2461.26,276.97 ccw(c2461.26,287.4) 2468.63,280.03 2477.12,288.51 cw(c2487.08,278.56) 2487.08,292.64 2583.81,292.64 2598.86,292.64 cw(c2598.86,286.29) 2605.21,286.29 2605.21,285.93 ccw(c2611.56,285.93) 2617.91,285.93 2617.91,288.26 cw(c2624.26,288.26) 2630.61,288.26 2630.61,285.93 ccw(c2636.96,285.93) 2643.31,285.93 2643.31,286.29 cw(c2649.66,286.29) 2649.66,292.64 2667.37,292.64 2713.5,292.64 ccw(c2713.5,310.18) 2725.89,297.76 cw(c2751.03,272.66) 2734.41,304.06 cw(c2744.03,285.89) 2744.03,306.44 3040.68,306.44 cw(c3040.68,299.18) 3047.95,299.18 3047.95,246.28 ccw(c3052.77,246.28) 3052.77,241.46 v1(3063.06,241.46)
LPDDR4_A5_A: U1.1A1 U12.J11 | length 930.3
  Top Layer w4.2: U12.J11@3047.31,407.81 v1(3063.06,420.6)
  Bottom Layer w4.2: v1(2467.76,343.92) 2467.76,371.41 cw(c2474.89,371.45) 2474.89,378.58 2485.61,378.58 cw(c2485.61,372.08) 2492.11,372.08 2492.11,367.12 ccw(c2498.61,367.12) 2505.11,367.12 2505.11,372.08 cw(c2511.61,372.08) 2518.11,372.08 2518.11,367.12 ccw(c2524.61,367.12) 2531.11,367.12 2531.11,372.08 cw(c2537.61,372.08) 2537.61,378.58 2555.7,378.58 cw(c2555.7,372.08) 2562.2,372.08 2562.2,367.18 ccw(c2568.7,367.18) 2575.2,367.18 2575.2,372.08 cw(c2581.7,372.08) 2588.2,372.08 2588.2,367.18 ccw(c2594.7,367.18) 2601.2,367.18 2601.2,372.08 cw(c2607.7,372.08) 2614.2,372.08 2614.2,367.18 ccw(c2620.7,367.18) 2627.2,367.18 2627.2,372.08 cw(c2633.7,372.08) 2633.7,378.58 2648.94,378.58 cw(c2648.94,372.66) 2654.86,372.66 2654.86,364.93 ccw(c2666.08,364.93) 2666.08,353.71 2890.16,353.71 2892.26,353.71 ccw(c2892.26,359.81) 2898.36,359.81 2898.36,364.63 cw(c2904.46,364.63) 2910.56,364.63 2910.56,358.45 ccw(c2916.66,358.45) 2922.76,358.45 2922.76,364.63 cw(c2928.86,364.63) 2934.96,364.63 2934.96,359.81 ccw(c2941.06,359.81) 2941.06,353.71 2953.43,353.71 3066.08,353.71 3067.49,353.54 ccw(c3068.73,364.06) 3079.33,364.06 3079.33,413.91 ccw(c3072.64,413.91) 3072.64,420.6 v1(3063.06,420.6)
LPDDR4_A5_B: U1.B8 U12.P11 | length 840.9
  Top Layer w4.2: v1(2394.98,307.57) 2403.64,307.57 cw(c2403.64,286.89) 2418.26,301.51 2441.07,278.7 ccw(c2448.27,285.89) 2443.71,276.79 ccw(c2448.27,285.89) U1.B8@2448.27,275.71 ; U12.P11@3047.31,279.85 v1(3063.06,267.05)
  Signal L2 w4.7: v1(2394.98,307.57) 2401.35,301.2 ; 2401.37,301.18 ccw(c2416.72,316.57) 2416.72,294.83 2444.47,294.83 ccw(c2444.47,313.13) 2457.39,300.18 2469.36,312.14 cw(c2483.14,298.36) 2483.14,317.85 3066.29,317.85 cw(c3066.29,304.07) 3080.07,304.07 3080.07,275.74 cw(c3071.38,275.74) 3071.38,267.05 v1(3063.06,267.05)
LPDDR4_CKE0_A: U1.B4 U12.J4 | length 835.9
  Top Layer w4.2: v1@2431.36,343.59 2443.49,343.59 cw(c2443.49,327.25) 2455.04,338.8 2463.19,330.65 ccw(c2488.29,355.74) 2488.29,320.26 U1.B4@2492.81,320.26 ; U12.J4@2826.84,407.81 v1(2842.59,395.01)
  Bottom Layer w4.2: 2415.14,359.95 2422.31,352.78 ccw(c2441.7,368.05) 2424.2,350.64 v1@2432.36,342.49 ; 2415.13,359.95 cw(c2426.24,371.06) 2410.54,371.06 cw(c2426.24,371.06) 2415.13,382.16 2452.32,419.35 cw(c2462.49,409.23) 2462.51,423.58 cw(c2462.49,408.15) 2473.43,419.02 ; 2473.46,418.99 2475.81,416.64 2498.93,393.53 ccw(c2503.99,398.59) 2499.49,393.02 ccw(c2503.99,398.59) 2503.99,391.43 2554.59,391.43 ccw(c2554.59,399.06) 2562.22,399.06 2562.22,440.42 cw(c2568.72,440.42) 2575.22,440.42 2575.22,398.41 ccw(c2581.72,398.41) 2588.22,398.41 2588.22,439.76 cw(c2594.72,439.76) 2601.22,439.76 2601.22,400.48 ccw(c2607.72,400.48) 2607.72,393.98 2662.63,393.98 cw(c2662.63,386.75) 2669.86,386.75 2669.86,373.96 ccw(c2677.61,373.96) 2677.61,366.21 2834.94,366.21 ccw(c2834.94,373.86) 2842.59,373.86 v1(2842.59,395.01)
  other v1: 2431.45,343.69
LPDDR4_CKE0_B: U1.1A3 U12.P4 | length 834.6
  Top Layer w4.2: U12.P4@2826.84,279.85 v1(2842.59,292.64)
  Bottom Layer w4.2: v1(2431.56,307.73) 2452.38,286.92 ccw(c2462.98,297.53) 2462.98,282.53 2473.2,282.53 cw(c2473.2,276.03) 2479.7,276.03 2479.7,270.64 ccw(c2486.2,270.64) 2492.7,270.64 2492.7,292.64 cw(c2499.2,292.64) 2505.7,292.64 2505.7,270.64 ccw(c2512.2,270.64) 2518.7,270.64 2518.7,292.64 cw(c2525.2,292.64) 2531.7,292.64 2531.7,270.64 ccw(c2538.2,270.64) 2544.7,270.64 2544.7,292.64 cw(c2551.2,292.64) 2557.7,292.64 2557.7,270.64 ccw(c2564.2,270.64) 2570.7,270.64 2570.7,292.64 cw(c2577.2,292.64) 2583.7,292.64 2583.7,270.64 ccw(c2590.2,270.64) 2596.7,270.64 2596.7,292.64 cw(c2603.2,292.64) 2609.7,292.64 2609.7,270.64 ccw(c2616.2,270.64) 2622.7,270.64 2622.7,276.03 cw(c2629.2,276.03) 2629.2,282.53 2652.36,282.53 ccw(c2652.36,290.03) 2659.86,290.03 2659.86,322.53 cw(c2667.36,322.53) 2667.36,330.03 2831.47,330.03 cw(c2831.47,318.91) 2842.59,318.91 v1(2842.59,292.64)
LPDDR4_CKE1_A: U1.1C3 U12.J5 | length 834.3
  Top Layer w4.2: U12.J5@2858.34,407.81 v1@2871.9,418.82
  Bottom Layer w4.2: v1(2395.37,343.92) 2395.37,390.96 cw(c2412.61,390.96) 2400.41,403.14 2471.76,474.48 cw(c2485.1,461.19) 2485.1,480.03 2607.08,480.03 cw(c2607.08,473.53) 2613.58,473.53 2613.58,431.91 ccw(c2620.08,431.91) 2626.58,431.91 2626.58,473.53 cw(c2633.08,473.53) 2639.58,473.53 2639.58,431.91 ccw(c2646.08,431.91) 2652.58,431.91 2652.58,473.53 cw(c2659.08,473.53) 2659.08,480.03 2664.86,480.03 cw(c2664.86,472.53) 2672.36,472.53 2672.36,436.24 ccw(c2687.36,436.24) 2676.75,425.63 2677.96,424.42 ccw(c2688.57,435.03) 2688.57,420.03 2746.14,420.03 cw(c2746.14,405.03) 2756.75,415.63 ccw(c2772.74,427.22) 2772.74,407.47 2854.61,407.47 ; 2854.61,407.47 ccw(c2854.61,422.81) 2865.48,411.99 v1(2872.09,418.6)
LPDDR4_CKE1_B: U1.1A2 U12.P5 | length 748.5
  Top Layer w4.2: U12.P5@2858.34,279.85 2858.82,279.85 2871.61,267.05 v1(2872.09,267.05)
  Signal L1 w4.7: v1(2449.66,325.83) 2449.66,287.73 ccw(c2457.33,287.7) 2457.38,280.03 2477.67,280.03 ccw(c2477.67,288.43) 2486.07,288.43 2486.07,292.12 cw(c2494.47,292.12) 2502.87,292.12 2502.87,282.65 ccw(c2511.27,282.65) 2519.67,282.65 2519.67,292.45 cw(c2528.07,292.45) 2536.47,292.45 2536.47,282.1 ccw(c2544.87,282.1) 2553.27,282.1 2553.27,291.79 cw(c2561.67,291.79) 2570.07,291.79 2570.07,282.32 ccw(c2578.47,282.32) 2586.87,282.32 2586.82,284.25 2586.81,284.41 cw(c2594.75,284.7) 2594.75,292.64 2722.51,292.64 cw(c2722.51,285.97) 2729.19,285.97 2729.19,279.85 ccw(c2737,279.85) 2737,272.04 2742.26,272.04 ccw(c2742.78,285.62) 2742.78,272.03 ccw(c2742.78,282.03) 2749.85,274.96 2751.99,277.1 cw(c2758.58,270.51) 2758.58,279.83 2855.73,279.83 ccw(c2855.73,286.25) 2862.15,286.24 2862.15,291.04 cw(c2868.65,291.03) 2868.65,297.53 2909.98,297.53 cw(c2909.98,290.65) 2916.85,290.65 2916.85,274.6 cw(c2909.31,274.6) 2909.31,267.05 v1(2872.09,267.05)
LPDDR4_CLK_A_N: U1.B5 U12.J9 | length 773.5
  Top Layer w3.5: U1.B5@2481.68,309.12 2482.25,309.69 2493.56,309.69 cw(c2493.56,299.96) 2500.43,306.85 2507.26,300.03 2507.26,299.92 2511.29,295.88 ccw(c2521.02,305.62) 2512.37,294.91 ccw(c2521.02,305.62) 2521.02,291.85 2589.18,291.85 ccw(c2589.18,300.03) 2597.36,300.03 2597.36,348.32 cw(c2614.49,348.32) 2614.49,365.46 2620.77,365.46 cw(c2620.77,348.5) 2637.72,348.5 2637.72,313.35 ccw(c2643.72,313.35) 2649.72,313.35 2649.72,342.53 cw(c2673.55,342.53) 2673.55,366.35 2877.42,366.35 ccw(c2877.42,373.83) 2884.9,373.83 2884.9,437.46 cw(c2903.15,437.46) 2903.15,455.71 2909.03,455.71 cw(c2909.03,438.46) 2926.28,438.46 2926.28,427.52 ccw(c2933.47,427.52) 2926.35,426.54 ccw(c2933.47,427.52) 2933.47,420.34 2965.77,420.34 cw(c2965.77,405.34) 2976.37,415.95 ; 2976.38,415.95 U12.J9@2983.82,408.51
LPDDR4_CLK_A_P: U1.A5 U12.J8 | length 772.3
  Top Layer w3.5: U1.A5@2492.81,297.99 2502.38,288.42 2502.49,288.42 2507.19,283.72 ccw(c2515.32,291.85) 2507.22,283.69 ccw(c2515.32,291.85) 2515.27,280.35 ; 2515.32,280.35 2589.86,280.35 ; 2589.86,280.36 ccw(c2589.18,300.03) 2608.86,300.03 2608.86,348.32 cw(c2614.49,348.32) 2614.49,353.96 2620.77,353.96 cw(c2620.77,348.5) 2626.22,348.5 2626.22,313.35 ccw(c2643.72,313.35) 2661.22,313.35 2661.22,342.53 cw(c2673.55,342.53) 2673.55,354.85 2704.96,354.85 2718.21,354.85 cw(c2718.21,351.35) 2721.71,351.35 2721.71,349.03 ccw(c2724.58,349.03) 2724.58,346.16 2730.33,346.16 ccw(c2730.33,349.03) 2733.21,349.03 2733.21,351.98 cw(c2736.08,351.98) 2736.08,354.85 2741.83,354.85 cw(c2741.83,351.98) 2744.71,351.98 2744.71,349.03 ccw(c2747.58,349.03) 2747.58,346.16 2753.33,346.16 ccw(c2753.33,349.03) 2756.21,349.03 2756.21,351.98 cw(c2759.08,351.98) 2759.08,354.85 2764.83,354.85 cw(c2764.83,351.98) 2767.71,351.98 2767.71,349.03 ccw(c2770.58,349.03) 2770.58,346.16 2776.33,346.16 ccw(c2776.33,349.03) 2779.21,349.03 2779.21,351.98 cw(c2782.08,351.98) 2782.08,354.85 2787.83,354.85 cw(c2787.83,351.98) 2790.71,351.98 2790.71,350.39 ccw(c2793.58,350.39) 2793.58,347.51 2799.33,347.51 ccw(c2799.33,350.39) 2802.21,350.39 2802.21,351.35 cw(c2805.71,351.35) 2805.71,354.85 2820.89,354.85 2877.42,354.85 ccw(c2877.42,373.83) 2896.4,373.83 2896.4,437.46 cw(c2903.15,437.46) 2903.15,444.21 2909.03,444.21 cw(c2909.03,438.46) 2914.78,438.46 2914.78,427.58 ccw(c2934.09,427.58) 2914.96,424.96 ccw(c2934.09,427.58) 2934.09,408.27 U12.J8@2950.99,408.27
LPDDR4_CLK_B_N: U1.B7 U12.P9 | length 741.2
  Top Layer w3.5: U1.B7@2459.41,286.85 2459.98,287.42 2473.62,287.42 cw(c2473.62,277.19) 2480.85,284.43 2499.19,266.08 ccw(c2509.8,276.69) 2509.8,261.69 2559.74,261.69 cw(c2559.74,244.94) 2576.49,244.94 2576.49,240.02 ccw(c2581.74,240.02) 2586.99,240.02 2586.99,244.94 cw(c2603.74,244.94) 2620.49,244.94 2620.49,240.02 ccw(c2625.74,240.02) 2630.99,240.02 2630.99,256.71 cw(c2652.99,256.71) 2652.99,278.71 2662.85,278.71 ccw(c2662.82,289.58) 2673.69,289.58 2673.69,314.21 cw(c2677.19,314.21) 2673.69,314.36 2673.73,315.41 cw(c2695.52,313.61) 2693.67,335.39 ; 2693.67,335.44 2865,335.44 cw(c2865,303.43) 2897,303.43 2897,269.03 ccw(c2901.42,269.03) 2901.42,264.62 2909.59,264.62 ccw(c2909.59,269.18) 2914.16,269.18 2914.16,279.88 cw(c2925.62,279.88) 2917.34,287.82 cw(c2928.99,276.17) 2918.53,288.89 cw(c2928.99,276.17) 2926.76,292.49 cw(c2928.99,276.17) 2928.99,292.64 2964.71,292.64 cw(c2964.71,276.16) 2976.34,287.85 U12.P9@2983.71,280.47
LPDDR4_CLK_B_P: U1.A7 U12.P8 | length 743.9
  Top Layer w3.5: U1.A7@2470.54,275.71 2473.3,275.71 2480.46,268.55 cw(c2477.63,265.72) 2480.46,262.9 ccw(c2483.29,260.07) 2480.46,257.24 2482.23,255.47 ccw(c2485.05,258.3) 2487.88,255.47 cw(c2490.71,252.64) 2493.54,255.47 2496.18,252.83 ccw(c2502.56,259.21) 2502.56,250.19 2503.24,250.19 2514.49,250.19 cw(c2514.49,245.44) 2519.24,245.44 2519.24,244.64 ccw(c2523.99,244.64) 2528.74,244.64 2528.74,245.44 cw(c2533.49,245.44) 2538.24,245.44 ccw(c2542.99,245.44) 2547.74,245.44 cw(c2552.49,245.44) 2552.49,250.19 2559.52,250.19 2559.74,250.19 cw(c2559.74,244.94) 2564.99,244.94 2564.99,240.02 ccw(c2581.74,240.02) 2598.49,240.02 2598.49,244.94 cw(c2603.74,244.94) 2608.99,244.94 2608.99,240.02 ccw(c2625.74,240.02) 2642.49,240.02 2642.49,256.71 cw(c2652.99,256.71) 2652.99,267.21 2659.27,267.21 2662.86,267.21 ccw(c2662.82,289.58) 2685.19,289.58 2685.19,296.13 2685.19,309.45 2685.19,314.21 cw(c2688.69,314.22) 2685.2,314.5 cw(c2695.52,313.61) 2694.63,323.93 2769.62,323.94 cw(c2769.62,320.44) 2773.12,320.44 2773.12,319.1 ccw(c2775.42,319.1) 2775.42,316.8 2782.32,316.8 ccw(c2782.32,319.1) 2784.62,319.1 2784.62,320.44 cw(c2788.12,320.44) 2788.12,323.94 2833.56,323.94 cw(c2833.56,320.44) 2837.06,320.44 2837.06,319.1 ccw(c2839.36,319.1) 2839.36,316.8 2846.26,316.8 ccw(c2846.26,319.1) 2848.56,319.1 2848.56,320.44 cw(c2852.06,320.44) 2852.06,323.94 2865,323.94 cw(c2865,303.43) 2885.5,303.43 2885.5,269.03 ccw(c2901.42,269.03) 2901.42,253.12 2909.59,253.12 ccw(c2909.59,269.18) 2925.66,269.18 2925.66,275.12 cw(c2930.12,275.12) 2930.12,279.59 2952.57,279.59 U12.P8@2952.82,279.85
LPDDR4_CS0n_A: U1.B3 U12.H4 | length 781.8
  Top Layer w4.2: U1.B3@2503.95,331.39 2503.95,318.69 ccw(c2511.95,318.66) 2506.27,313.03 2509.35,309.95 ccw(c2515.32,315.96) 2515.32,307.49 2517.65,307.49 2565.19,307.49 ccw(c2565.19,324.7) 2577.36,312.53 ccw(c2565.28,324.6) 2582.36,324.6 2582.36,363.49 cw(c2606.4,363.49) 2606.4,387.53 2627.43,387.53 ccw(c2627.43,393.68) 2633.58,393.68 2633.58,394.44 cw(c2639.73,394.44) 2645.88,394.44 2645.88,393.68 ccw(c2652.03,393.68) 2652.03,387.53 2676.41,387.53 ; v1(2657.36,407.49) 2676.97,407.49 cw(c2676.97,402.41) 2682.04,402.41 2682.04,393.14 cw(c2676.43,393.14) 2676.43,387.53 ; U12.H4@2826.84,433.4 v1(2842.59,420.6)
  Signal L2 w4.7: v1(2657.36,407.49) ccw(c2642.17,422.67) 2663.64,422.67 2663.64,450.53 cw(c2669.29,450.53) 2666.73,455.57 cw(c2669.29,450.53) 2669.29,456.18 2678.44,456.18 cw(c2678.44,451.05) 2682.78,453.79 cw(c2678.83,451.3) 2683.5,451.3 2683.5,402.73 ccw(c2691.22,402.73) 2691.22,395.01 2712.89,395.01 ccw(c2712.89,399.76) 2717.63,399.76 2717.63,407.85 cw(c2722.98,407.85) 2722.98,413.2 2753.69,413.2 ccw(c2753.69,421.6) 2753.69,430 2723.97,430 cw(c2723.97,437.34) 2716.63,437.34 cw(c2724.26,437.34) 2724.26,444.97 2785.7,444.97 2785.9,444.98 cw(c2786.05,436.02) 2795.01,436.02 2795.01,414.65 ccw(c2802.09,414.65) 2802.09,407.57 2837.39,407.57 ccw(c2837.39,412.78) 2842.59,412.78 v1(2842.59,420.6)
LPDDR4_CS0n_B: U1.1B5 U12.R4 | length 834.6
  Top Layer w4.2: U12.R4@2826.84,254.26 v1(2842.59,267.05)
  Bottom Layer w4.2: v1(2377.28,289.64) 2401.77,289.64 2401.83,289.64 cw(c2401.82,270.68) 2415.22,284.08 2445.27,254.03 2445.31,254 ccw(c2454.83,263.53) 2454.83,250.05 ; 2454.86,250.05 2474.44,250.05 cw(c2474.44,244.82) 2479.68,244.82 2479.68,234.34 ccw(c2484.92,234.34) 2484.92,229.1 2487.44,229.1 ccw(c2487.44,234.34) 2492.68,234.34 2492.68,244.82 cw(c2497.92,244.82) 2497.92,250.05 2500.44,250.05 cw(c2500.44,244.82) 2505.68,244.82 2505.68,234.34 ccw(c2510.92,234.34) 2510.92,229.1 2513.44,229.1 ccw(c2513.44,234.34) 2518.68,234.34 2518.68,244.82 cw(c2523.92,244.82) 2523.92,250.05 2526.44,250.05 cw(c2526.44,244.82) 2531.68,244.82 2531.68,234.34 ccw(c2536.92,234.34) 2536.92,229.1 2539.44,229.1 ccw(c2539.44,234.34) 2544.68,234.34 2544.68,244.82 cw(c2549.92,244.82) 2549.92,250.05 2552.44,250.05 cw(c2552.44,244.82) 2557.68,244.82 2557.68,234.34 ccw(c2562.92,234.34) 2562.92,229.1 2565.44,229.1 ccw(c2565.44,234.34) 2570.68,234.34 2570.68,244.82 cw(c2575.92,244.82) 2575.92,250.05 2578.44,250.05 cw(c2578.44,244.82) 2583.68,244.82 2583.68,234.34 ccw(c2588.92,234.34) 2588.92,229.1 2591.44,229.1 ccw(c2591.44,234.34) 2596.68,234.34 2596.68,244.82 cw(c2601.92,244.82) 2601.92,250.05 2604.44,250.05 cw(c2604.44,244.82) 2609.68,244.82 2609.68,234.34 ccw(c2614.92,234.34) 2614.92,229.1 2617.44,229.1 ccw(c2617.44,234.34) 2622.68,234.34 2622.68,244.41 cw(c2628.45,244.41) 2628.45,250.18 2630.97,250.18 cw(c2630.97,245.47) 2635.68,245.47 2635.68,234.34 ccw(c2640.92,234.34) 2640.92,229.1 2667.95,229.1 ccw(c2667.95,236.01) 2674.86,236.01 2674.86,307.18 cw(c2685.21,307.18) 2685.21,317.53 2821.65,317.53 cw(c2821.65,309.32) 2829.86,309.32 2829.86,286 ccw(c2844.86,286) 2834.25,275.4 v1(2842.59,267.05)
LPDDR4_CS1n_A: U1.A3 U12.H3 | length 771.9
  Top Layer w4.2: U1.A3@2515.08,320.26 2560.12,320.26 ccw(c2560.12,331.93) 2571.8,331.93 2571.8,371.7 cw(c2594.03,371.7) 2578.29,387.4 2588.93,398.04 ccw(c2570.25,416.71) 2596.66,416.71 ; 2596.66,416.75 2596.66,431.55 cw(c2602.81,431.55) 2608.96,431.55 2608.96,414.06 2608.96,413.13 ccw(c2614.57,413.13) 2614.47,407.52 ccw(c2614.52,411.72) 2614.53,407.52 2614.6,407.52 2614.67,407.52 v1(2622.36,407.8) ; U12.H3@2795.34,433.4 v1(2811.1,420.6)
  Signal L2 w4.7: v1(2622.36,407.8) 2584.13,407.8 cw(c2584.13,414.58) 2577.36,414.58 2577.36,464.85 cw(c2585.03,464.85) 2585.03,472.53 2587.66,472.53 cw(c2587.66,464.13) 2596.06,464.13 2596.06,435.85 ccw(c2604.46,435.85) 2612.86,435.85 2612.86,464.13 cw(c2621.26,464.13) 2629.66,464.13 2629.66,435.85 ccw(c2638.06,435.85) 2646.46,435.85 2646.46,461.1 cw(c2657.89,461.1) 2657.89,472.52 2701.65,472.52 cw(c2701.65,460.75) 2709.97,469.07 2710.52,468.52 ccw(c2717.51,475.52) 2717.51,465.63 2754.71,465.63 cw(c2754.76,455.9) 2754.81,465.63 cw(c2754.76,455.9) 2761.63,462.78 2762.73,461.69 ccw(c2769.99,468.95) 2769.99,458.68 ; 2770.02,458.68 2803.61,458.68 cw(c2803.61,450.88) 2811.41,450.88 v1@2811.41,420.91
LPDDR4_CS1n_B: U1.1A5 U12.R3 | length 834.6
  Top Layer w4.2: U12.R3@2795.34,254.26 v1(2811.1,267.05)
  Bottom Layer w4.2: v1(2395.37,271.54) 2446.47,220.44 ccw(c2458.31,232.28) 2458.34,215.54 2475.91,215.54 cw(c2475.91,211.04) 2480.41,211.04 2480.41,204.03 ccw(c2486.91,204.03) 2493.41,204.03 2493.41,210.16 cw(c2499.91,210.16) 2506.41,210.16 2506.41,204.03 ccw(c2512.91,204.03) 2519.41,204.03 2519.41,210.16 cw(c2525.91,210.16) 2532.41,210.16 2532.41,204.03 ccw(c2538.91,204.03) 2545.41,204.03 2545.41,210.16 cw(c2551.91,210.16) 2558.41,210.16 2558.41,204.03 ccw(c2564.91,204.03) 2571.41,204.03 2571.41,210.16 cw(c2577.91,210.16) 2584.41,210.16 2584.41,204.03 ccw(c2590.91,204.03) 2597.41,204.03 2597.41,210.16 cw(c2603.91,210.16) 2610.41,210.16 2610.41,204.03 ccw(c2616.91,204.03) 2623.41,204.03 2623.41,210.16 cw(c2629.91,210.16) 2636.41,210.16 2636.41,204.03 ccw(c2642.91,204.03) 2649.41,204.03 2649.41,210.16 cw(c2655.91,210.16) 2662.41,210.16 2662.41,204.03 ccw(c2668.91,204.03) 2675.41,204.03 2675.41,210.16 cw(c2681.91,210.16) 2688.41,210.16 2688.41,204.03 ccw(c2694.91,204.03) 2701.41,204.03 2701.41,210.16 cw(c2707.91,210.16) 2714.41,210.16 2714.41,204.03 ccw(c2720.91,204.03) 2720.91,197.53 2756.11,197.53 ccw(c2756.14,205.29) 2761.63,199.8 ccw(c2753.84,207.59) 2764.86,207.59 2764.86,215.81 2764.86,217.91 ccw(c2758.76,217.91) 2758.76,224.01 2737.12,224.01 cw(c2737.12,230.11) 2737.12,236.21 2758.76,236.21 ccw(c2758.76,242.31) 2764.86,242.31 2764.86,258.23 2764.86,258.3 cw(c2773.3,258.32) 2772.45,266.73 cw(c2772.83,262.54) 2772.83,266.74 2810.78,266.74 v1(2811.1,267.05)
LPDDR4_DM0_A: U1.1E2 U12.C3 | length 754.4
  Top Layer w4.2: U12.C3@2795.34,561.35 2803.68,561.35 ccw(c2803.68,567.52) 2809.86,567.52 v1(2809.86,625.03)
  Signal L1 w4.7: v1(2377.28,398.21) 2381.1,394.38 ccw(c2386.71,400.06) 2392.35,394.42 2423.4,425.47 ccw(c2409.09,439.78) 2429.33,439.75 2429.33,442.65 ccw(c2406.94,442.61) 2422.77,458.43 ; 2410.96,470.25 2422.74,458.47 ; 2410.95,470.26 cw(c2422.96,482.25) 2405.99,482.25 2405.99,499.92 cw(c2422.69,499.95) 2410.88,511.75 2537.92,638.79 cw(c2591.53,585.18) 2591.53,661 2816.64,661 cw(c2816.64,650.22) 2827.42,650.22 2827.42,634.51 cw(c2817.94,634.51) 2817.94,625.03 v1(2809.86,625.03)
LPDDR4_DM0_B: U1.1B8 U12.Y3 | length 846.6
  Top Layer w4.2: U12.Y3@2795.34,126.31 v1(2811.1,139.1)
  Signal L1 w4.7: v1(2322.99,235.35) 2319.71,231.87 ccw(c2324.84,226.74) 2319.71,221.61 2329.35,211.03 2343.56,196.82 cw(c2323.93,177.19) 2351.69,177.19 2351.69,155.03 ccw(c2379.07,155.03) 2359.71,135.66 2382.82,112.55 2413.4,81.97 ccw(c2425.34,93.92) 2425.34,77.03 2458.55,77.03 cw(c2458.55,67.17) 2468.4,67.17 2468.4,45.31 ccw(c2478.52,45.31) 2478.52,35.2 2619.99,35.2 cw(c2619.99,29.35) 2625.84,29.35 ; 2625.84,29.09 ccw(c2631.69,29.09) 2637.54,29.09 2637.54,29.81 cw(c2643.39,29.81) 2649.24,29.81 2649.24,29.09 ccw(c2655.09,29.09) 2660.94,29.09 2660.94,29.81 cw(c2666.79,29.81) 2672.58,30.64 2672.64,30.64 2672.64,29.09 ccw(c2678.49,29.09) 2684.34,29.09 2684.34,30.03 cw(c2690.19,29.81) 2696.04,29.81 2696.04,29.09 ccw(c2701.89,29.09) 2707.74,29.09 ; 2707.74,29.35 cw(c2713.59,29.35) 2713.59,35.2 2787.99,35.2 ccw(c2787.99,42.5) 2795.29,42.5 2795.29,102.21 ccw(c2789.94,102.21) 2789.94,107.56 2781.82,107.56 cw(c2781.82,112.03) 2781.75,107.56 cw(c2781.82,112.03) 2777.35,112.03 2777.35,115.93 cw(c2781.69,115.93) 2781.69,120.26 2789.94,120.26 ccw(c2789.94,125.61) 2795.29,125.61 2795.29,142.65 cw(c2803.11,142.7) 2803.1,150.51 cw(c2803.11,142.68) 2810.9,143.39 v1(2811.1,139.1)